# Altium PCB PCI Express_16765X6890_64PIN_Low profile_Clear.PCBDOC (part 2 of 9)
Units mm, origin at the board's own origin, x right, y up, seen from the top; angles counter-clockwise.
Board outline 80.71 x 137.84 mm, 6 copper layers (Top Layer, Layer 2 (GND), Layer 3, Layer 4, Layer 5 (AGND), Bottom Layer), stack 1.571 mm thick; 507 components, 297 nets, 1544 pads, 616 vias.
Unrouted connection lines stored in the file: 101.
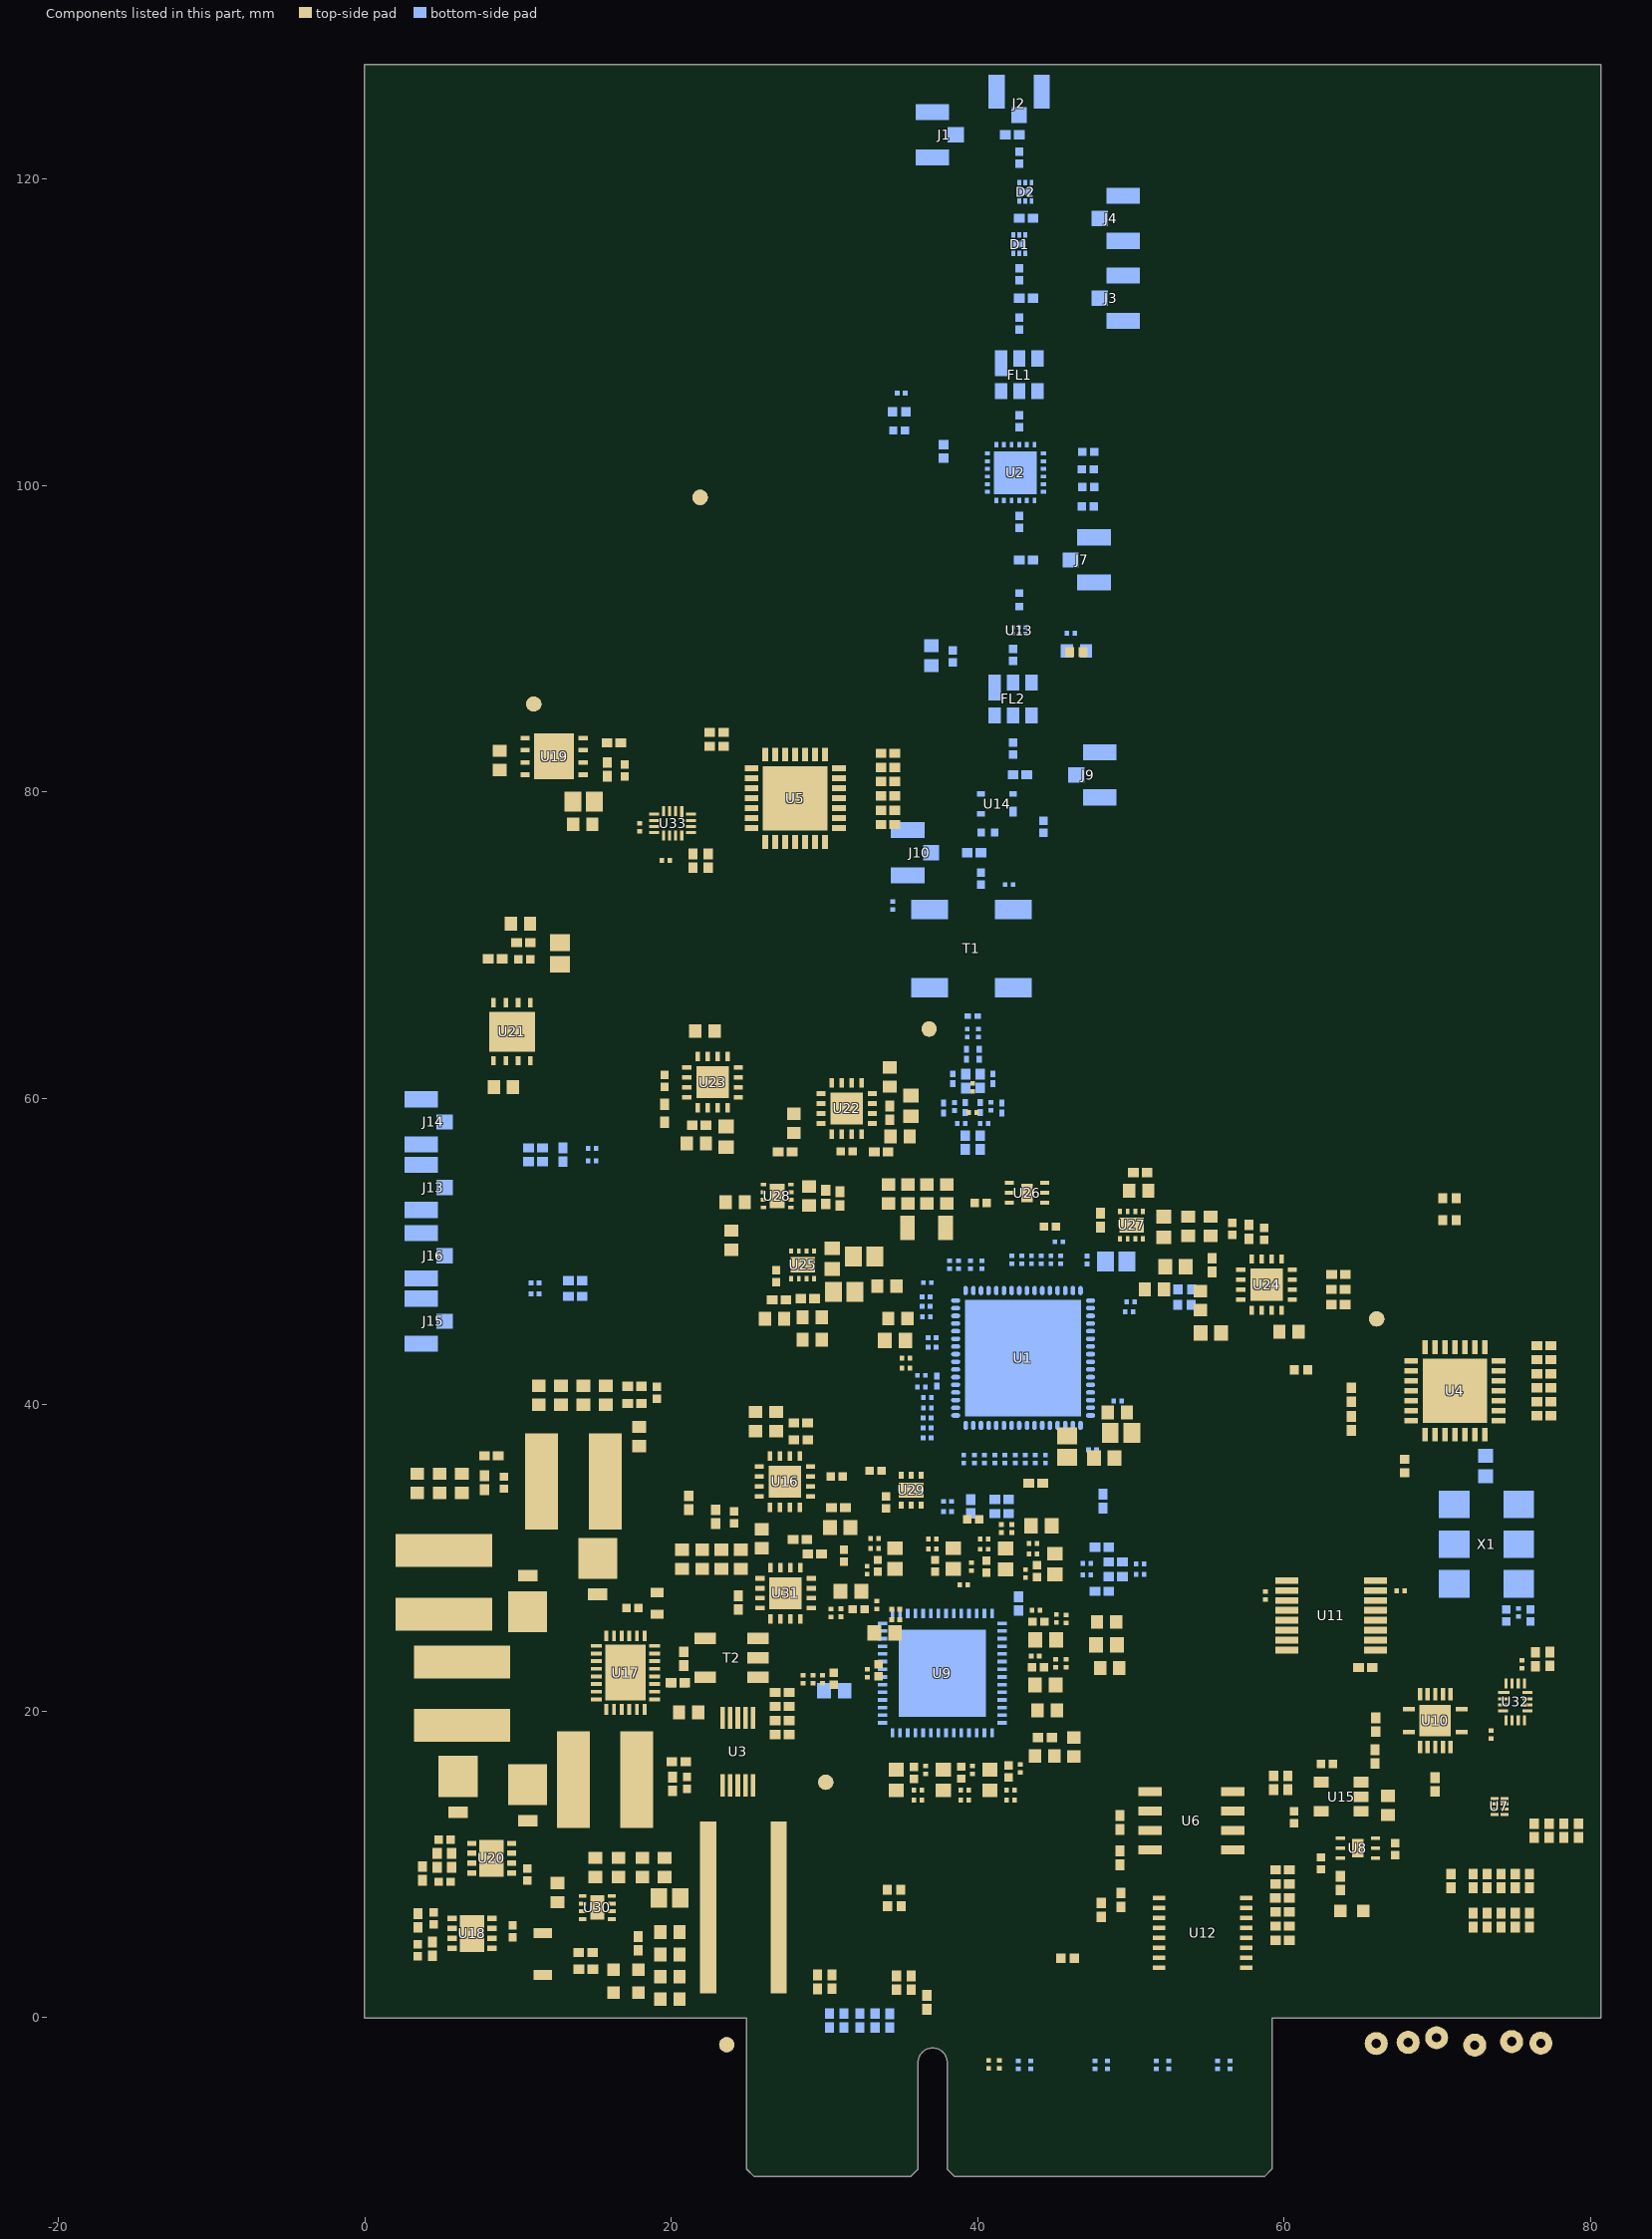
[diagram p4: the components of this part, seen from the top]

## Footprints (in the part's own frame and the unit in brackets; to place one, negate y for a bottom-side part, rotate by r counter-clockwise, add the part's x,y. Pads: shape width x height; smd on the part's side, far side on the other; paste and mask are expansions set on the pad) (continued)
MCP23017/MCP23S17 [mm] "QFN, 28-Leads, Body 6,00x6,00mm, Pitch 0,65mm, Thermal Pad 4,25x4,25mm, IPC High Density"
  rect 0.9x0.37 smd: 1(-2.85,1.95) 2(-2.85,1.3) 3(-2.85,0.65) 4(-2.85,0) 5(-2.85,-0.65) 6(-2.85,-1.3) 7(-2.85,-1.95) 15(2.85,-1.95) 16(2.85,-1.3) 17(2.85,-0.65) 18(2.85,0) 19(2.85,0.65) 20(2.85,1.3) 21(2.85,1.95)
  rect 0.37x0.9 smd: 8(-1.95,-2.85) 9(-1.3,-2.85) 10(-0.65,-2.85) 11(0,-2.85) 12(0.65,-2.85) 13(1.3,-2.85) 14(1.95,-2.85) 22(1.95,2.85) 23(1.3,2.85) 24(0.65,2.85) 25(0,2.85) 26(-0.65,2.85) 27(-1.3,2.85) 28(-1.95,2.85)
  rect 4.2x4.2 smd paste-2.125: 29(0,0)
  silkscreen extent -3.92,-3.15 3.15,3.15, body extent -3,-3 3,3, height 1
PCA9306 [mm] "8-XFDFN, Body 1,40x1,00mm, Pitch 0,35mm, IPC High Density"
  rect 0.53x0.2 smd: 1(-0.335,0.525) 2(-0.335,0.175) 3(-0.335,-0.175) 4(-0.335,-0.525) 5(0.335,-0.525) 6(0.335,-0.175) 7(0.335,0.175) 8(0.335,0.525)
  silkscreen extent -0.86,0.79 -0.76,0.89, body extent -0.53,-0.72 0.53,0.72, height 0.4
RC1206 [mm] "Chip Resistor, 2-Leads, Body 3,10x1,60mm, IPC High Density"
  rect 0.95x1.6 smd: 1(-1.25,0) 2(1.25,0)
  silkscreen extent -0.5,-0.7 0.5,0.7, body extent -1.6,-0.85 1.6,0.85, height 0.65
"RES 0201/0603" [mm] "Chip Resistor, 2-Leads, Body 0.60x0.30mm, IPC Medium Density"
  rect 0.44x0.35 smd: 1(-0.325,0) 2(0.325,0)
  silkscreen extent -0.7,-0.33 0.7,0.33, body extent -0.3,-0.15 0.3,0.15, height 0.21
"RES 0402/1005" [mm] "Chip Resistor, 2-Leads, Body 1.0x0.5mm, IPC Medium Density"
  rect 0.75x0.6 smd: 1(-0.575,0) 2(0.575,0)
  silkscreen extent -1.14,-0.51 1.14,0.51, body extent -0.5,-0.25 0.5,0.25, height 0.35
"RES 0402/1005 RF" [mm] "Chip Resistor, 2-Leads, Body 1.0x0.5mm, IPC High Density"
  rect 0.7x0.6 smd: 1(-0.45,0) 2(0.45,0)
  silkscreen extent -1.02,-0.51 1.02,0.51, body extent -0.5,-0.25 0.5,0.25, height 0.35
"RES 0603/1608" [mm] "Chip Resistor, 2-Leads, Body 1.60x0.80mm, IPC Medium Density"
  rect 0.85x0.95 smd: 1(-0.65,0) 2(0.65,0)
  silkscreen extent -1.27,-0.7 1.27,0.7, body extent -0.8,-0.4 0.8,0.4, height 0.45
SC18IS602B [mm] "TSSOP16: plastic thin shrink small outline package; 16 leads; body width 4.4 mm"
  rect 0.8x0.3 smd: 1(-2.85,2.275) 2(-2.85,1.625) 3(-2.85,0.975) 4(-2.85,0.325) 5(-2.85,-0.325) 6(-2.85,-0.975) 7(-2.85,-1.625) 8(-2.85,-2.275) 9(2.85,-2.275) 10(2.85,-1.625) 11(2.85,-0.975) 12(2.85,-0.325) 13(2.85,0.325) 14(2.85,0.975) 15(2.85,1.625) 16(2.85,2.275)
  silkscreen extent -2.97,-2.55 1.85,3.12, body extent -3.2,-2.55 3.2,2.55, height 1.1
SN74AXC4T774PWR [mm] "TSOP,PW0016A, 16-Leads, Body 5,00x4,40mm, Pitch 0,65mm, IPC High Density"
  rect 1.5x0.45 smd: 1(-2.9,2.275) 2(-2.9,1.625) 3(-2.9,0.975) 4(-2.9,0.325) 5(-2.9,-0.325) 6(-2.9,-0.975) 7(-2.9,-1.625) 8(-2.9,-2.275) 9(2.9,-2.275) 10(2.9,-1.625) 11(2.9,-0.975) 12(2.9,-0.325) 13(2.9,0.325) 14(2.9,0.975) 15(2.9,1.625) 16(2.9,2.275)
  silkscreen extent -3.02,-2.55 1.85,3.17, body extent -3.2,-2.55 3.2,2.55, height 1.2
SN74LV4T125RGYR [mm] "14-VFQFN Exposed Pad"
  rect 0.8x0.28 smd: 1(-1.733,-0.75) 7(1.717,-0.75) 8(1.717,0.75) 14(-1.733,0.75)
  rect 0.28x0.8 smd: 2(-1.008,-1.725) 3(-0.508,-1.725) 4(-0.008,-1.725) 5(0.492,-1.725) 6(0.992,-1.725) 9(0.992,1.725) 10(0.492,1.725) 11(-0.008,1.725) 12(-0.508,1.725) 13(-1.008,1.725)
  rect 2.05x2.05 smd paste-3: 15(-0.008,0)
  silkscreen extent -1.81,-1.8 1.79,1.8, body extent -1.81,-1.8 1.79,1.8, height 1
TAI-SAW_3X3P6 [mm] "TA1251B, 6-Pins, Body 3,00x3,00mmx1,40mm, Pitch 1,20mm, IPC Medium Density"
  rect 1.7x0.81 smd: 1(-0.75,1.2)
  rect 1.05x0.81 smd: 2(-1.07,0) 3(-1.07,-1.2) 4(1.07,-1.2) 5(1.07,0) 6(1.07,1.2)
  silkscreen extent -2.27,-2 1.6,2, body extent -1.5,-1.5 1.5,1.5, height 1.4
TECO-1909763-1_V [mm] "SMD, 3-Leads, Body 2.6x2.6mm, Height 1.25mm"
  rect 1.05x2.2 smd: 1(-1.475,0) 3(1.475,0)
  rect 1x1.05 smd: 2(0,-1.525)
  silkscreen extent -1.9,-1.78 0.55,1.3, body extent -1.5,-1.55 1.5,1.55, height 1.23
"Test Point" [mm]
  round 1.5 hole 0.6: 1(0,0)
TPS7A3501 [mm] "6-WDFN Exposed Pad"
  rect 0.45x0.3 smd: 1(-0.975,0.65) 2(-0.975,0) 3(-0.975,-0.65) 4(0.975,-0.65) 5(0.975,0) 6(0.975,0.65)
  rect 1x1.6 smd: 7(0,0)
  silkscreen extent -1.5,-1.2 1.05,1.25, body extent -1.13,-1.05 1.13,1.05, height 0.8
TPS62163 [mm] "DSG0008A WSON - 0.8 mm max height"
  rect 0.5x0.25 smd: 1(-0.95,0.75) 2(-0.95,0.25) 3(-0.95,-0.25) 4(-0.95,-0.75) 5(0.95,-0.75) 6(0.95,-0.25) 7(0.95,0.25) 8(0.95,0.75)
  rect 0.9x1.6 smd: 9(0,0)
  silkscreen extent -1.5,-1.2 1.05,1.25, body extent -1.1,-1.05 1.1,1.05, height 0.8
TSNP-6-10-FP [mm] "TSNP-6-10-FP, SOTFL, 6-Leads, Body 1,10x0,80mm, Pitch 0,40mm, IPC Medium Density"
  rect 0.25x0.25 smd: 1(-0.2,0.4) 2(-0.2,0) 3(-0.2,-0.4) 4(0.2,-0.4) 5(0.2,0) 6(0.2,0.4)
  silkscreen extent -0.39,0.8 -0.29,0.9, body extent -0.4,-0.55 0.4,0.55, height 0.37
TXB0304 [mm] "RSV0016A UQFN - 0.55 mm max height"
  rect 0.75x0.2 smd: 1(-0.75,0.6)
  rect 0.65x0.2 smd: 2(-0.8,0.2) 3(-0.8,-0.2) 4(-0.8,-0.6) 9(0.8,-0.6) 10(0.8,-0.2) 11(0.8,0.2) 12(0.8,0.6)
  rect 0.2x0.65 smd: 5(-0.6,-1.2) 6(-0.2,-1.2) 7(0.2,-1.2) 8(0.6,-1.2) 13(0.6,1.2) 14(0.2,1.2) 15(-0.2,1.2) 16(-0.6,1.2)
  silkscreen extent -1.27,1.58 -1.18,1.67, body extent -0.92,-1.33 0.92,1.33, height 0.55
VG-4513CA [mm] "SON, 6-Leads, Body 7,00x5,00mm, Pitch 2,60mm, IPC High Density"
  rect 2x1.8 smd: 1(-2.1,2.6) 2(-2.1,0) 3(-2.1,-2.6) 4(2.1,-2.6) 5(2.1,0) 6(2.1,2.6)
  silkscreen extent -3.36,3.66 -3.26,3.76, body extent -2.6,-3.6 2.6,3.6, height 1.8
VLF3012ST-2R2M1R4 [mm] "Precision Wire Wound Inductor, 2-Leads, Body 3.00x2.80mm, IPC High Density"
  rect 0.65x1.2 smd: 1(-1.375,0) 2(1.375,0)
  silkscreen extent -1.5,-1.4 1.5,1.4, body extent -1.6,-1.4 1.6,1.4, height 1.3

## Part data
C1 C7: library part Capacitor, Case/Package=0201, Case Code (Metric)=0603, Dielectric=C0G, Manufacturer 1=Murata, Manufacturer Part Number 1=GJM0335C1E4R0CB01D, Max Operating Temperature=125°C, Min Operating Temperature=-55°C, Package Quantity=1, Supplier Part Number 1=490-3068-1-ND, Voltage Rating=25V, Capacitance=4pF, Case Code (Imperial)=0201, ComponentLink1Description=https://datasheet.ciiva.com/133/product-133426.pdf?src-supplier=Digi-Key, ComponentLink1URL=https://datasheet.ciiva.com/133/product-133426.pdf?src-supplier=Digi-Key, ComponentLink2Description=https://datasheet.ciiva.com/133/partnumbering-e-01-133427.pdf?src-supplier=Digi-Key, ComponentLink2URL=https://datasheet.ciiva.com/133/partnumbering-e-01-133427.pdf?src-supplier=Digi-Key, ComponentLink3Description=https://datasheet.ciiva.com/133/partnumbering-e-01-133428.pdf?src-supplier=Digi-Key, ComponentLink3URL=https://datasheet.ciiva.com/133/partnumbering-e-01-133428.pdf?src-supplier=Digi-Key, ComponentLink4Description=https://datasheet.ciiva.com/16467/l0005e-16467449.pdf?src-supplier=Future+Electronics, ComponentLink4URL=https://datasheet.ciiva.com/16467/l0005e-16467449.pdf?src-supplier=Future+Electronics, ComponentLink5Description=https://datasheet.ciiva.com/11613/product-11613563.pdf?src-supplier=Avnet, ComponentLink5URL=https://datasheet.ciiva.com/11613/product-11613563.pdf?src-supplier=Avnet, Depth=0.3mm, Height=0.3mm, Lead Free="Lead Free", Length=0.6mm, Mount="Surface Mount", Packaging="Tape and Reel", Pricing 1="1=0.10000, 10=0.07300, 100=0.03240, 500=0.02318, 1000=0.01821, 2500=0.01655, 5000=0.01523 (USD)", Radiation Hardening=No, RoHS=Yes, Stock 1=33697, Supplier 1=Digi-Key, Termination=SMD/SMT, Thickness=0.013inch, Voltage Rating (DC)=25V, Width=0.012inch
C2 C5 C8: library part Capacitor, Case/Package=0201, Case Code (Metric)=0603, Dielectric=C0G, Manufacturer 1=Murata, Manufacturer Part Number 1=GRM0335C1E1R0CA01D, Max Operating Temperature=125°C, Min Operating Temperature=-55°C, Package Quantity=15000, Supplier Part Number 1=490-7749-1-ND, Voltage Rating=25V, Capacitance=1pF, Case Code (Imperial)=0201, ComponentLink1Description=https://datasheet.ciiva.com/29540/partnumbering-e-01-29540585.pdf?src-supplier=Digi-Key, ComponentLink1URL=https://datasheet.ciiva.com/29540/partnumbering-e-01-29540585.pdf?src-supplier=Digi-Key, ComponentLink2Description=https://datasheet.ciiva.com/29540/partnumbering-e-01-29540586.pdf?src-supplier=Digi-Key, ComponentLink2URL=https://datasheet.ciiva.com/29540/partnumbering-e-01-29540586.pdf?src-supplier=Digi-Key, ComponentLink3Description=https://datasheet.ciiva.com/29540/partnumbering-e-01-29540587.pdf?src-supplier=Digi-Key, ComponentLink3URL=https://datasheet.ciiva.com/29540/partnumbering-e-01-29540587.pdf?src-supplier=Digi-Key, Depth=0.3mm, Height=0.3mm, Lead Free="Lead Free", Length=0.6mm, Mount="Surface Mount", Packaging="Tape and Reel", Pricing 1="1=0.10000, 10=0.01500, 100=0.00680, 500=0.00484, 1000=0.00380, 2500=0.00345, 5000=0.00317 (USD)", REACH SVHC="No SVHC", RoHS=Yes, Stock 1=33122, Supplier 1=Digi-Key, Termination=SMD/SMT, Thickness=0.013inch, Voltage Rating (DC)=25V, Width=0.012inch
C3 C4 C6 C175 C176 C178 C179 C183 C185 C186 C187 C188 C189 C223 C224 C225 C226 C227 C228: library part Capacitor, Case/Package=0201, Case Code (Metric)=0603, Dielectric=X5R, Manufacturer 1=Yageo, Manufacturer Part Number 1=CC0201KRX5R6BB104, Max Operating Temperature=85°C, Min Operating Temperature=-55°C, Supplier Part Number 1=311-1593-1-ND, Tolerance=10%, Voltage Rating=10V, Capacitance=100nF, Case Code (Imperial)=0201, ComponentLink1Description=https://datasheet.ciiva.com/17437/upy-gphc-x5r-4v-to-50v-12-17437495.pdf?src-supplier=Avnet+Europe, ComponentLink1URL=https://datasheet.ciiva.com/17437/upy-gphc-x5r-4v-to-50v-12-17437495.pdf?src-supplier=Avnet+Europe, ComponentLink2Description=https://datasheet.ciiva.com/11587/upy-gphc-x5r-4v-to-50v-12-11587190.pdf?src-supplier=Avnet, ComponentLink2URL=https://datasheet.ciiva.com/11587/upy-gphc-x5r-4v-to-50v-12-11587190.pdf?src-supplier=Avnet, Composition=Ceramic, Depth=0.3mm, Halogen Free="Halogen Free", Height=0.3mm, Lead Free="Lead Free", Length=0.6mm, Mount="Surface Mount", Packaging="Tape and Reel", Pricing 1="1=0.10000, 10=0.03800, 100=0.01690, 500=0.01208, 1000=0.00949, 2500=0.00862, 5000=0.00794 (USD)", Radiation Hardening=No, RoHS=Yes, Stock 1=1229391, Supplier 1=Digi-Key, Termination=SMD/SMT, Thickness=0.013inch, Voltage Rating (DC)=10V, Weight=6E-06oz, Width=0.012inch
C9 C15 C16 C17 C18 C27 C88 C89 C99 C100 C101 C102 C103 C104 C105 C106 C107 C108 C109 C110 C111 C113 C114 C115 C116 C117 C118 C119 C120 C121 C122 C123 C124 C125 C132 C133 C134 C136 C137 C138 C139 C150 C151 C152 C154 C155 C156 C158 C159 C160 C162 C163 C164 C166 C167 C174 C181 C182 C184 C191 C192 C193 C195 C196 C197 C199 C200 C201 C203 C204 C205 C207 C208 C209 C211 C212 C213 C215 C216 C217 C229 C233 C234 C235 C236: library part Capacitor, Case/Package=0201, Case Code (Metric)=0603, Dielectric=X5R, Manufacturer 1=Murata, Manufacturer Part Number 1=GRM033R61C104ME84D, Max Operating Temperature=85°C, Min Operating Temperature=-55°C, Package Quantity=15000, Supplier Part Number 1=490-9986-1-ND, Tolerance=20%, Voltage Rating=16V, Capacitance=100nF, Case Code (Imperial)=0201, Height=0.3mm, Length=0.024inch, Mount="Surface Mount", Packaging="Tape and Reel", Pricing 1="1=0.10000, 10=0.05400, 100=0.02430, 500=0.01732, 1000=0.01361, 2500=0.01238, 5000=0.01139 (USD)", RoHS=Yes, Supplier 1=Digi-Key, Termination=SMD/SMT, Thickness=0.013inch, Voltage Rating (DC)=16V, Weight=1.2E-05oz, Width=0.3mm
  C9 C27 C132 C133 C134 C136 C137 C138 C139 C229: ComponentLink1Description=http://www.mouser.com/ds/2/281/c02e-2905.pdf?src-supplier=Mouser, ComponentLink1URL=http://www.mouser.com/ds/2/281/c02e-2905.pdf?src-supplier=Mouser, ComponentLink2Description=http://search.murata.co.jp/Ceramy/image/img/A01X/G101/ENG/GRM033R61C104ME84-01.pdf?src-supplier=Digi-Key, ComponentLink2URL=http://search.murata.co.jp/Ceramy/image/img/A01X/G101/ENG/GRM033R61C104ME84-01.pdf?src-supplier=Digi-Key, Stock 1=550070
  C15 C16 C17 C18 C233 C234 C235 C236: ComponentLink1Description=http://www.mouser.com/ds/2/281/c02e-2905.pdf?src-supplier=Mouser, ComponentLink1URL=http://www.mouser.com/ds/2/281/c02e-2905.pdf?src-supplier=Mouser, ComponentLink2Description=http://search.murata.co.jp/Ceramy/image/img/A01X/G101/ENG/GRM033R61C104ME84-01.pdf?src-supplier=Digi-Key, ComponentLink2URL=http://search.murata.co.jp/Ceramy/image/img/A01X/G101/ENG/GRM033R61C104ME84-01.pdf?src-supplier=Digi-Key, Stock 1=502660
  C88 C89 C99 C100 C101 C102 C103 C104 C105 C106 C107 C108 C109 C110 C111 C113 C114 C115 C116 C117 C118 C119 C120 C121 C122 C123 C124 C125: ComponentLink1Description=http://search.murata.co.jp/Ceramy/image/img/A01X/G101/ENG/GRM033R61C104KE84-01.pdf?src-supplier=Digi-Key, ComponentLink1URL=http://search.murata.co.jp/Ceramy/image/img/A01X/G101/ENG/GRM033R61C104KE84-01.pdf?src-supplier=Digi-Key, ComponentLink2Description=https://search.murata.co.jp/Ceramy/image/img/A01X/G101/ENG/GRM033R61C104KE84-01.pdf?src-supplier=Digi-Key, ComponentLink2URL=https://search.murata.co.jp/Ceramy/image/img/A01X/G101/ENG/GRM033R61C104KE84-01.pdf?src-supplier=Digi-Key, ComponentLink3Description=http://www.mouser.com/ds/2/281/c02e-2905.pdf?src-supplier=Mouser, ComponentLink3URL=http://www.mouser.com/ds/2/281/c02e-2905.pdf?src-supplier=Mouser, ComponentLink4Description=http://search.murata.co.jp/Ceramy/image/img/A01X/G101/ENG/GRM033R61C104ME84-01.pdf?src-supplier=Digi-Key, ComponentLink4URL=http://search.murata.co.jp/Ceramy/image/img/A01X/G101/ENG/GRM033R61C104ME84-01.pdf?src-supplier=Digi-Key, Stock 1=550070
  C150 C151 C152 C154 C155 C156 C158 C159 C160 C162 C163 C164 C166 C167 C174 C181 C182 C184 C191 C192 C193 C195 C196 C197 C199 C200 C201 C203 C204 C205 C207 C208 C209 C211 C212 C213 C215 C216 C217: ComponentLink1Description=http://www.mouser.com/ds/2/281/c02e-2905.pdf?src-supplier=Mouser, ComponentLink1URL=http://www.mouser.com/ds/2/281/c02e-2905.pdf?src-supplier=Mouser, ComponentLink2Description=http://search.murata.co.jp/Ceramy/image/img/A01X/G101/ENG/GRM033R61C104ME84-01.pdf?src-supplier=Digi-Key, ComponentLink2URL=http://search.murata.co.jp/Ceramy/image/img/A01X/G101/ENG/GRM033R61C104ME84-01.pdf?src-supplier=Digi-Key, Stock 1=503570
C10 C153 C157 C161 C165 C180 C190 C194 C198 C202 C206 C210 C214 C218: library part Capacitor, Case/Package=0402, Case Code (Metric)=1005, Dielectric=X5R, Manufacturer 1="Taiyo Yuden", Manufacturer Part Number 1=AMK105CBJ106MV-F, Max Operating Temperature=85°C, Min Operating Temperature=-55°C, Package Quantity=1, Supplier Part Number 1=587-3237-1-ND, Tolerance=20%, Voltage Rating=4V, Capacitance=10uF, Case Code (Imperial)=0402, ComponentLink1Description=https://datasheet.ciiva.com/6255/amk105cbj106mv-f-ss-6255363.pdf?src-supplier=Digi-Key, ComponentLink1URL=https://datasheet.ciiva.com/6255/amk105cbj106mv-f-ss-6255363.pdf?src-supplier=Digi-Key, ComponentLink2Description=https://datasheet.ciiva.com/30133/411amk105cbj106mv-f-30133635.pdf?src-supplier=Onlinecomponents.com, ComponentLink2URL=https://datasheet.ciiva.com/30133/411amk105cbj106mv-f-30133635.pdf?src-supplier=Onlinecomponents.com, ComponentLink3Description=https://datasheet.ciiva.com/15916/2amk105cbj106mv-f-15916827.pdf?src-supplier=Onlinecomponents.com, ComponentLink3URL=https://datasheet.ciiva.com/15916/2amk105cbj106mv-f-15916827.pdf?src-supplier=Onlinecomponents.com, Halogen Free="Halogen Free", Height=0.5mm, Length=0.039inch, Mount="Surface Mount", Packaging="Tape and Reel", Pricing 1="1=0.24000, 10=0.16500, 100=0.08340, 500=0.05708, 1000=0.05050, 2500=0.04830, 5000=0.04391 (USD)", REACH SVHC=Unknown, RoHS=Yes, Supplier 1=Digi-Key, Termination=SMD/SMT, Thickness=0.028inch, Voltage Rating (DC)=4V, Width=0.02inch
  C10: Stock 1=547645
  C153 C157 C161 C165 C180 C190 C194 C198 C202 C206 C210 C214 C218: Stock 1=313152
C11 C12 C13 C14: library part Capacitor, Case/Package=0402, Dielectric=C0G, Manufacturer 1="Walsin Technologies", Manufacturer Part Number 1=0402N331F500CT, Max Operating Temperature=125°C, Min Operating Temperature=-55°C, Supplier Part Number 1=1292-1307-1-ND, Tolerance=1%, Capacitance=330pF, ComponentLink1Description=http://components.arrow.com/part/dataview/0323_06535843?src-supplier=Arrow+Europe, ComponentLink1URL=http://components.arrow.com/part/dataview/0323_06535843?src-supplier=Arrow+Europe, ComponentLink2Description=http://www.passivecomponent.com/indexsea/0402N331F500CT-IN.pdf?src-supplier=Digi-Key, ComponentLink2URL=http://www.passivecomponent.com/indexsea/0402N331F500CT-IN.pdf?src-supplier=Digi-Key, Depth=0.5mm, Length=1mm, Packaging="Tape and Reel", Pricing 1="1=0.12000, 10=0.09000, 100=0.04030, 500=0.02876, 1000=0.02260, 2500=0.02054, 5000=0.01890 (USD)", RoHS=Yes, Stock 1=23341, Supplier 1=Digi-Key
C19 C20 C239 C240 C241 C242 C243 C244: library part Capacitor, Case/Package=0201, Dielectric=X5R, Manufacturer 1=Murata, Manufacturer Part Number 1=GRM033R61C104KE84J, Max Operating Temperature=85°C, Min Operating Temperature=-55°C, Supplier Part Number 1=490-16742-1-ND, Tolerance=10%, Voltage Rating=16V, Capacitance=100nF, ComponentLink1Description=http://search.murata.co.jp/Ceramy/image/img/A01X/G101/ENG/GRM033R61C104KE84-01.pdf?src-supplier=Digi-Key, ComponentLink1URL=http://search.murata.co.jp/Ceramy/image/img/A01X/G101/ENG/GRM033R61C104KE84-01.pdf?src-supplier=Digi-Key, ComponentLink2Description=https://search.murata.co.jp/Ceramy/image/img/A01X/G101/ENG/GRM033R61C104KE84-01.pdf?src-supplier=Digi-Key, ComponentLink2URL=https://search.murata.co.jp/Ceramy/image/img/A01X/G101/ENG/GRM033R61C104KE84-01.pdf?src-supplier=Digi-Key, Length=0.024inch, Mount="Surface Mount", Packaging="Tape and Reel", Pricing 1="1=0.10000, 10=0.06800, 100=0.03040, 500=0.02174, 1000=0.01708, 2500=0.01552, 5000=0.01428 (USD)", RoHS=Yes, Stock 1=54410, Supplier 1=Digi-Key, Thickness=0.013inch, Voltage Rating (DC)=16V, Width=0.012inch
C21 C22: library part Capacitor, Case/Package=0402, Case Code (Metric)=1005, Dielectric=C0G, Manufacturer 1="Kyocera AVX", Manufacturer Part Number 1=04025A220JAT2A, Max Operating Temperature=125°C, Min Operating Temperature=-55°C, Package Quantity=1, Supplier Part Number 1=478-1074-1-ND, Temperature Coefficient=30ppm/°C, Tolerance=5%, Voltage=50V, Capacitance=22pF, Case Code (Imperial)=0402, ComponentLink1Description=https://datasheet.ciiva.com/11787/0900766b80def0e2-11787300.pdf?src-supplier=RSComponents, ComponentLink1URL=https://datasheet.ciiva.com/11787/0900766b80def0e2-11787300.pdf?src-supplier=RSComponents, ComponentLink2Description=https://datasheet.ciiva.com/39121/2009578-39121644.pdf?src-supplier=Jameco, ComponentLink2URL=https://datasheet.ciiva.com/39121/2009578-39121644.pdf?src-supplier=Jameco, ComponentLink3Description=https://datasheet.ciiva.com/1123/ccog-1123585.pdf?src-supplier=Element14, ComponentLink3URL=https://datasheet.ciiva.com/1123/ccog-1123585.pdf?src-supplier=Element14, ComponentLink4Description=https://datasheet.ciiva.com/1123/ccog-1123586.pdf?src-supplier=Element14, ComponentLink4URL=https://datasheet.ciiva.com/1123/ccog-1123586.pdf?src-supplier=Element14, ComponentLink5Description=https://datasheet.ciiva.com/150/ccog-150515.pdf?src-supplier=Digi-Key, ComponentLink5URL=https://datasheet.ciiva.com/150/ccog-150515.pdf?src-supplier=Digi-Key, ComponentLink6Description=https://datasheet.ciiva.com/150/ccog-150516.pdf?src-supplier=Digi-Key, ComponentLink6URL=https://datasheet.ciiva.com/150/ccog-150516.pdf?src-supplier=Digi-Key, ComponentLink7Description=https://datasheet.ciiva.com/150/ccog-150517.pdf?src-supplier=Digi-Key, ComponentLink7URL=https://datasheet.ciiva.com/150/ccog-150517.pdf?src-supplier=Digi-Key, ComponentLink8Description=https://datasheet.ciiva.com/2987/ccog-2987653.pdf?src-supplier=Avnet, ComponentLink8URL=https://datasheet.ciiva.com/2987/ccog-2987653.pdf?src-supplier=Avnet, ComponentLink9Description=https://datasheet.ciiva.com/2987/ccog-2987654.pdf?src-supplier=Avnet, ComponentLink9URL=https://datasheet.ciiva.com/2987/ccog-2987654.pdf?src-supplier=Avnet, ComponentLink10Description=https://datasheet.ciiva.com/5423/ccog-243403-5423927.pdf?src-supplier=Mouser, ComponentLink10URL=https://datasheet.ciiva.com/5423/ccog-243403-5423927.pdf?src-supplier=Mouser, ComponentLink11Description=https://datasheet.ciiva.com/16218/ccog-16218185.pdf?src-supplier=Future+Electronics, ComponentLink11URL=https://datasheet.ciiva.com/16218/ccog-16218185.pdf?src-supplier=Future+Electronics, ComponentLink12Description=https://datasheet.ciiva.com/28592/759117-28592746.pdf?src-supplier=Element14, ComponentLink12URL=https://datasheet.ciiva.com/28592/759117-28592746.pdf?src-supplier=Element14, ComponentLink13Description=https://datasheet.ciiva.com/15165/getdatasheetpartid-38041-15165131.pdf?src-supplier=Verical, ComponentLink13URL=https://datasheet.ciiva.com/15165/getdatasheetpartid-38041-15165131.pdf?src-supplier=Verical, Contact Plating=Tin,Matte, Depth=0.5mm, Height=0.5mm, Lead Free="Lead Free", Length=1mm, Mount="Surface Mount", Number of Pins=2, Packaging="Tape and Reel", Pricing 1="1=0.10000, 10=0.03500, 100=0.01550, 500=0.01108, 1000=0.00871, 2500=0.00792, 5000=0.00729 (USD)", Radiation Hardening=No, REACH SVHC="No SVHC", RoHS=Yes, Stock 1=672328, Supplier 1=Digi-Key, Termination=SMD/SMT, Thickness=0.022inch, Voltage Rating=50V, Voltage Rating (DC)=50V, Width=0.02inch
C23 C24 C25 C28 C29 C30 C31 C32: library part Capacitor, Case/Package=0402, Dielectric=C0G, Dielectric Material=Ceramic, Manufacturer 1=KEMET, Manufacturer Part Number 1=C0402C330J5GACTU, Max Operating Temperature=125°C, Min Operating Temperature=-55°C, Supplier Part Number 1=399-1017-1-ND, Temperature Coefficient=30ppm/°C, Tolerance=5%, Voltage=50V, Capacitance=33pF, ComponentLink1Description=https://datasheet.ciiva.com/45846/kem-c1003-c0g-smd-45846921.pdf?src-supplier=Onlinecomponents.com, ComponentLink1URL=https://datasheet.ciiva.com/45846/kem-c1003-c0g-smd-45846921.pdf?src-supplier=Onlinecomponents.com, Depth=0.5mm, Height=0.5mm, Lead Free="Lead Free", Length=1mm, Mount="Surface Mount", Packaging="Tape and Reel", Pricing 1="1=0.10000, 10=0.03900, 100=0.01740, 500=0.01240, 1000=0.00974, 2500=0.00886, 5000=0.00815 (USD)", Radiation Hardening=No, RoHS=Yes, Stock 1=690392, Supplier 1=Digi-Key, Termination=SMD/SMT, Voltage Rating (DC)=50V
C26: library part Capacitor, Case/Package=0603, Case Code (Metric)=1608, Dielectric=X5R, Manufacturer 1="Kyocera AVX", Manufacturer Part Number 1=0603ZD225MAT2A, Max Operating Temperature=85°C, Min Operating Temperature=-55°C, Package Quantity=1, Supplier Part Number 1=478-7941-1-ND, Tolerance=20%, Voltage Rating=10V, Capacitance=2.2uF, Case Code (Imperial)=0603, ComponentLink1Description=https://datasheet.ciiva.com/13189/cx5r-13189447.pdf?src-supplier=Mouser, ComponentLink1URL=https://datasheet.ciiva.com/13189/cx5r-13189447.pdf?src-supplier=Mouser, ComponentLink2Description=https://datasheet.ciiva.com/14905/cx5r-14905223.pdf?src-supplier=Digi-Key, ComponentLink2URL=https://datasheet.ciiva.com/14905/cx5r-14905223.pdf?src-supplier=Digi-Key, ComponentLink3Description=https://datasheet.ciiva.com/14905/cx5r-14905224.pdf?src-supplier=Digi-Key, ComponentLink3URL=https://datasheet.ciiva.com/14905/cx5r-14905224.pdf?src-supplier=Digi-Key, ComponentLink4Description=https://datasheet.ciiva.com/214/cx5r-214837.pdf?src-supplier=Digi-Key, ComponentLink4URL=https://datasheet.ciiva.com/214/cx5r-214837.pdf?src-supplier=Digi-Key, ComponentLink5Description=https://datasheet.ciiva.com/7614/cx5r-7614715.pdf?src-supplier=Digi-Key, ComponentLink5URL=https://datasheet.ciiva.com/7614/cx5r-7614715.pdf?src-supplier=Digi-Key, Depth=0.81mm, Lead Free="Lead Free", Length=1.6mm, Mount="Surface Mount", Number of Pins=2, Packaging="Tape and Reel", Pricing 1="1=0.22000, 10=0.15300, 100=0.07740, 500=0.05296, 1000=0.04686 (USD)", REACH SVHC=Unknown, RoHS=Yes, Stock 1=2703, Supplier 1=Digi-Key, Termination=SMD/SMT, Thickness=0.035inch, Voltage Rating (DC)=10V, Width=0.032inch
C33: library part Capacitor, Case/Package=0603, Case Code (Metric)=1608, Dielectric=X5R, Manufacturer 1=Samsung, Manufacturer Part Number 1=CL10A105KA8NNNC, Max Operating Temperature=85°C, Min Operating Temperature=-55°C, Package Quantity=1, Supplier Part Number 1=1276-1102-1-ND, Tolerance=10%, Voltage=25V, Capacitance=1uF, Case Code (Imperial)=0603, ComponentLink1Description=https://datasheet.ciiva.com/25801/cl10a105ka8nnnc-25801364.pdf?src-supplier=Digi-Key, ComponentLink1URL=https://datasheet.ciiva.com/25801/cl10a105ka8nnnc-25801364.pdf?src-supplier=Digi-Key, ComponentLink2Description=https://datasheet.ciiva.com/26838/getdatasheetpartid-357530-26838332.pdf?src-supplier=Verical, ComponentLink2URL=https://datasheet.ciiva.com/26838/getdatasheetpartid-357530-26838332.pdf?src-supplier=Verical, ComponentLink3Description=https://datasheet.ciiva.com/29198/458162-da-01-en-vs-kondensator-0603-29198475.pdf?src-supplier=Conrad, ComponentLink3URL=https://datasheet.ciiva.com/29198/458162-da-01-en-vs-kondensator-0603-29198475.pdf?src-supplier=Conrad, Contact Plating=Tin, Depth=0.8mm, Height=0.8mm, Lead Free="Lead Free", Length=1.6mm, Material=Ceramic, Mount="Surface Mount", Packaging="Tape and Reel", Pricing 1="1=0.10000, 10=0.04100, 100=0.01850, 500=0.01320, 1000=0.01037 (USD)", Radiation Hardening=No, RoHS=Yes, Stock 1=3421596, Supplier 1=Digi-Key, Thickness=0.035inch, Voltage Rating=25V, Voltage Rating (DC)=25V, Width=0.031inch
C34: library part Capacitor, Case/Package=0402, Case Code (Metric)=1005, Dielectric=X5R, Manufacturer 1=Murata, Manufacturer Part Number 1=GRM155R60J225ME95D, Max Operating Temperature=85°C, Min Operating Temperature=-55°C, Supplier Part Number 1=490-13407-1-ND, Tolerance=20%, Voltage=6.3V, Capacitance=2.2uF, Case Code (Imperial)=0402, ComponentLink1Description=https://datasheet.ciiva.com/46418/1754687-46418043.pdf?src-supplier=Element14, ComponentLink1URL=https://datasheet.ciiva.com/46418/1754687-46418043.pdf?src-supplier=Element14, Depth=0.5mm, Height=0.5mm, Lead Free="Lead Free", Length=1mm, Mount="Surface Mount", Packaging="Cut Tape", Pricing 1="1=0.12000, 10=0.08600, 100=0.04050, 500=0.02842, 1000=0.02353, 2500=0.02190, 5000=0.02004 (USD)", REACH SVHC="No SVHC", RoHS=Yes, Stock 1=221253, Supplier 1=Digi-Key, Thickness=0.022inch, Voltage Rating=6.3V, Voltage Rating (DC)=6.3V, Width=0.02inch
C35 C36 C38 C40 C41 C42 C43 C76 C77 C78 C80 C81 C82 C83 C85 C86 C93 C98 C127 C130 C219 C220: library part Capacitor, Case/Package=0603, Case Code (Metric)=1608, Dielectric=X5R, Manufacturer 1=Samsung, Manufacturer Part Number 1=CL10A475KO8NNNC, Max Operating Temperature=85°C, Min Operating Temperature=-55°C, Package Quantity=1, Supplier Part Number 1=1276-1784-1-ND, Tolerance=10%, Voltage=16V, Capacitance=4.7uF, Case Code (Imperial)=0603, ComponentLink1Description=https://datasheet.ciiva.com/25795/cl10a475ko8nnnc-25795890.pdf?src-supplier=Digi-Key, ComponentLink1URL=https://datasheet.ciiva.com/25795/cl10a475ko8nnnc-25795890.pdf?src-supplier=Digi-Key, ComponentLink2Description=https://datasheet.ciiva.com/26838/getdatasheetpartid-358619-26838383.pdf?src-supplier=Verical, ComponentLink2URL=https://datasheet.ciiva.com/26838/getdatasheetpartid-358619-26838383.pdf?src-supplier=Verical, ComponentLink3Description=https://datasheet.ciiva.com/29198/457663-da-01-en-vs-kondensator-0603-29198671.pdf?src-supplier=Conrad, ComponentLink3URL=https://datasheet.ciiva.com/29198/457663-da-01-en-vs-kondensator-0603-29198671.pdf?src-supplier=Conrad, Contact Plating=Tin, Depth=0.8mm, Height=0.8mm, Length=1.6mm, Material=Ceramic, Mount="Surface Mount", Packaging="Tape and Reel", Pricing 1="1=0.26000, 10=0.17800, 100=0.10100, 500=0.07128, 1000=0.06237 (USD)", Radiation Hardening=No, RoHS=Yes, Supplier 1=Digi-Key, Thickness=0.035inch, Voltage Rating=16V, Width=0.031inch
  C35 C36 C38 C40 C41 C42 C43: Stock 1=468811
  C76 C77 C78 C80 C81 C82 C83 C85 C86 C93 C98 C127 C130: Stock 1=472881
  C219 C220: Stock 1=457572
C37: library part Capacitor, Case/Package=0402, Case Code (Metric)=1005, Dielectric=X7R, Manufacturer 1="Kyocera AVX", Manufacturer Part Number 1=04025C101KAT2A, Max Operating Temperature=125°C, Min Operating Temperature=-55°C, Package Quantity=1, Supplier Part Number 1=478-1089-1-ND, Tolerance=10%, Voltage=50V, Capacitance=100pF, Case Code (Imperial)=0402, ComponentLink1Description=https://datasheet.ciiva.com/34303/1928935-34303276.pdf?src-supplier=Jameco, ComponentLink1URL=https://datasheet.ciiva.com/34303/1928935-34303276.pdf?src-supplier=Jameco, ComponentLink2Description=https://datasheet.ciiva.com/151/cx7r-151045.pdf?src-supplier=Digi-Key, ComponentLink2URL=https://datasheet.ciiva.com/151/cx7r-151045.pdf?src-supplier=Digi-Key, ComponentLink3Description=https://datasheet.ciiva.com/22619/1679506-22619749.pdf?src-supplier=Element14, ComponentLink3URL=https://datasheet.ciiva.com/22619/1679506-22619749.pdf?src-supplier=Element14, ComponentLink4Description=https://datasheet.ciiva.com/151/cx7r-151046.pdf?src-supplier=Digi-Key, ComponentLink4URL=https://datasheet.ciiva.com/151/cx7r-151046.pdf?src-supplier=Digi-Key, ComponentLink5Description=https://datasheet.ciiva.com/5415/cx7r-218113-5415051.pdf?src-supplier=Mouser, ComponentLink5URL=https://datasheet.ciiva.com/5415/cx7r-218113-5415051.pdf?src-supplier=Mouser, ComponentLink6Description=https://datasheet.ciiva.com/28586/1818074-28586573.pdf?src-supplier=Element14, ComponentLink6URL=https://datasheet.ciiva.com/28586/1818074-28586573.pdf?src-supplier=Element14, ComponentLink7Description=https://datasheet.ciiva.com/151/cx7r-151047.pdf?src-supplier=Digi-Key, ComponentLink7URL=https://datasheet.ciiva.com/151/cx7r-151047.pdf?src-supplier=Digi-Key, ComponentLink8Description=https://datasheet.ciiva.com/28453/1679506-28453959.pdf?src-supplier=Element14, ComponentLink8URL=https://datasheet.ciiva.com/28453/1679506-28453959.pdf?src-supplier=Element14, ComponentLink9Description=https://datasheet.ciiva.com/28586/1679506-28586589.pdf?src-supplier=Element14, ComponentLink9URL=https://datasheet.ciiva.com/28586/1679506-28586589.pdf?src-supplier=Element14, ComponentLink10Description=https://datasheet.ciiva.com/16287/cx7r-16287262.pdf?src-supplier=Future+Electronics, ComponentLink10URL=https://datasheet.ciiva.com/16287/cx7r-16287262.pdf?src-supplier=Future+Electronics, Depth=0.5mm, Lead Free="Lead Free", Length=1mm, Mount="Surface Mount", Number of Pins=2, Packaging="Tape and Reel", Pricing 1="1=0.10000, 10=0.06000, 100=0.02650, 500=0.01894, 1000=0.01488, 2500=0.01353, 5000=0.01245 (USD)", Radiation Hardening=No, REACH SVHC="No SVHC", RoHS=Yes, Stock 1=434421, Supplier 1=Digi-Key, Termination=SMD/SMT, Thickness=0.022inch, Voltage Rating=50V, Voltage Rating (DC)=50V, Width=0.02inch
C39 C79 C84 C87 C221 C232: library part Capacitor, Case/Package=0402, Case Code (Metric)=1005, Dielectric=C0G, Dielectric Material=Ceramic, Insulation Resistance=10GR, Manufacturer 1=Murata, Manufacturer Part Number 1=GRM1555C1H102JA01D, Max Operating Temperature=125°C, Min Operating Temperature=-55°C, Package Quantity=1, Supplier Part Number 1=490-3244-1-ND, Temperature Coefficient=30ppm/°C, Tolerance=5%, Voltage=50V, Capacitance=1nF, Case Code (Imperial)=0402, ComponentLink7Description=https://datasheet.ciiva.com/132/grm1555c1h102ja01-01-132801.pdf?src-supplier=Digi-Key, ComponentLink7URL=https://datasheet.ciiva.com/132/grm1555c1h102ja01-01-132801.pdf?src-supplier=Digi-Key, ComponentLink8Description=https://datasheet.ciiva.com/7828/4360-7828821.pdf?src-supplier=Element14, ComponentLink8URL=https://datasheet.ciiva.com/7828/4360-7828821.pdf?src-supplier=Element14, ComponentLink9Description=https://datasheet.ciiva.com/7828/1747436-7828822.pdf?src-supplier=Element14, ComponentLink9URL=https://datasheet.ciiva.com/7828/1747436-7828822.pdf?src-supplier=Element14, Depth=0.5mm, Height=0.5mm, Lead Free="Lead Free", Length=1mm, Material=Ceramic, Mount="Surface Mount", Number of Pins=2, Packaging="Tape and Reel", Pricing 1="1=0.11000, 10=0.07900, 100=0.03700, 500=0.02596, 1000=0.02149, 2500=0.02000, 5000=0.01830 (USD)", Radiation Hardening=No, REACH SVHC="No SVHC", RoHS=Yes, Supplier 1=Digi-Key, Termination=SMD/SMT, Thickness=0.022inch, Voltage Rating=50V, Voltage Rating (DC)=50V, Width=0.5mm
  C39 C79 C84 C87: ComponentLink1Description=https://datasheet.ciiva.com/132/grm1555c1h102ja01-01-132799.pdf?src-supplier=Digi-Key, ComponentLink1URL=https://datasheet.ciiva.com/132/grm1555c1h102ja01-01-132799.pdf?src-supplier=Digi-Key, ComponentLink2Description=https://datasheet.ciiva.com/132/product-132800.pdf?src-supplier=Digi-Key, ComponentLink2URL=https://datasheet.ciiva.com/132/product-132800.pdf?src-supplier=Digi-Key, ComponentLink3Description=https://datasheet.ciiva.com/34302/1855908-34302849.pdf?src-supplier=Jameco, ComponentLink3URL=https://datasheet.ciiva.com/34302/1855908-34302849.pdf?src-supplier=Jameco, ComponentLink4Description=https://datasheet.ciiva.com/18184/getdatasheetpartid-90260-18184180.pdf?src-supplier=Verical, ComponentLink4URL=https://datasheet.ciiva.com/18184/getdatasheetpartid-90260-18184180.pdf?src-supplier=Verical, ComponentLink5Description=https://datasheet.ciiva.com/29200/453569-da-01-en-vs-kondensator-0402-29200121.pdf?src-supplier=Conrad, ComponentLink5URL=https://datasheet.ciiva.com/29200/453569-da-01-en-vs-kondensator-0402-29200121.pdf?src-supplier=Conrad, ComponentLink6Description=https://datasheet.ciiva.com/14116/grmseries-tc-hitype-eng-14116858.pdf?src-supplier=Distrelec, ComponentLink6URL=https://datasheet.ciiva.com/14116/grmseries-tc-hitype-eng-14116858.pdf?src-supplier=Distrelec, Stock 1=5306035
  C221: ComponentLink1Description=https://datasheet.ciiva.com/132/grm1555c1h102ja01-01-132799.pdf?src-supplier=Digi-Key, ComponentLink1URL=https://datasheet.ciiva.com/132/grm1555c1h102ja01-01-132799.pdf?src-supplier=Digi-Key, ComponentLink2Description=https://datasheet.ciiva.com/132/product-132800.pdf?src-supplier=Digi-Key, ComponentLink2URL=https://datasheet.ciiva.com/132/product-132800.pdf?src-supplier=Digi-Key, ComponentLink3Description=https://datasheet.ciiva.com/34302/1855908-34302849.pdf?src-supplier=Jameco, ComponentLink3URL=https://datasheet.ciiva.com/34302/1855908-34302849.pdf?src-supplier=Jameco, ComponentLink4Description=https://datasheet.ciiva.com/18184/getdatasheetpartid-90260-18184180.pdf?src-supplier=Verical, ComponentLink4URL=https://datasheet.ciiva.com/18184/getdatasheetpartid-90260-18184180.pdf?src-supplier=Verical, ComponentLink5Description=https://datasheet.ciiva.com/29200/453569-da-01-en-vs-kondensator-0402-29200121.pdf?src-supplier=Conrad, ComponentLink5URL=https://datasheet.ciiva.com/29200/453569-da-01-en-vs-kondensator-0402-29200121.pdf?src-supplier=Conrad, ComponentLink6Description=https://datasheet.ciiva.com/14116/grmseries-tc-hitype-eng-14116858.pdf?src-supplier=Distrelec, ComponentLink6URL=https://datasheet.ciiva.com/14116/grmseries-tc-hitype-eng-14116858.pdf?src-supplier=Distrelec, Stock 1=5192940
  C232: ComponentLink1Description=https://datasheet.ciiva.com/132/product-132800.pdf?src-supplier=Digi-Key, ComponentLink1URL=https://datasheet.ciiva.com/132/product-132800.pdf?src-supplier=Digi-Key, ComponentLink2Description=https://datasheet.ciiva.com/34302/1855908-34302849.pdf?src-supplier=Jameco, ComponentLink2URL=https://datasheet.ciiva.com/34302/1855908-34302849.pdf?src-supplier=Jameco, ComponentLink3Description=https://datasheet.ciiva.com/18184/getdatasheetpartid-90260-18184180.pdf?src-supplier=Verical, ComponentLink3URL=https://datasheet.ciiva.com/18184/getdatasheetpartid-90260-18184180.pdf?src-supplier=Verical, ComponentLink4Description=https://datasheet.ciiva.com/11786/0900766b807a1cab-11786727.pdf?src-supplier=RSComponents, ComponentLink4URL=https://datasheet.ciiva.com/11786/0900766b807a1cab-11786727.pdf?src-supplier=RSComponents, ComponentLink5Description=https://datasheet.ciiva.com/132/grm1555c1h102ja01-01-132799.pdf?src-supplier=Digi-Key, ComponentLink5URL=https://datasheet.ciiva.com/132/grm1555c1h102ja01-01-132799.pdf?src-supplier=Digi-Key, ComponentLink6Description=https://datasheet.ciiva.com/29200/453569-da-01-en-vs-kondensator-0402-29200121.pdf?src-supplier=Conrad, ComponentLink6URL=https://datasheet.ciiva.com/29200/453569-da-01-en-vs-kondensator-0402-29200121.pdf?src-supplier=Conrad, ComponentLink10Description=https://datasheet.ciiva.com/14116/grmseries-tc-hitype-eng-14116919.pdf?src-supplier=Distrelec, ComponentLink10URL=https://datasheet.ciiva.com/14116/grmseries-tc-hitype-eng-14116919.pdf?src-supplier=Distrelec, ComponentLink11Description=https://datasheet.ciiva.com/14116/grmseries-tc-hitype-eng-14116858.pdf?src-supplier=Distrelec, ComponentLink11URL=https://datasheet.ciiva.com/14116/grmseries-tc-hitype-eng-14116858.pdf?src-supplier=Distrelec, Stock 1=5029183
C44 C50 C61: library part Capacitor, Case/Package=0402, Case Code (Metric)=1005, Dielectric=C0G, Manufacturer 1=Samsung, Manufacturer Part Number 1=CL05C220JB5NNNC, Max Operating Temperature=125°C, Min Operating Temperature=-55°C, Package Quantity=1, Supplier Part Number 1=1276-1116-1-ND, Temperature Coefficient=300ppm/°C, Tolerance=5%, Voltage=50V, Capacitance=22pF, Case Code (Imperial)=0402, ComponentLink1Description=https://datasheet.ciiva.com/15195/getdatasheetpartid-358448-15195679.pdf?src-supplier=Verical, ComponentLink1URL=https://datasheet.ciiva.com/15195/getdatasheetpartid-358448-15195679.pdf?src-supplier=Verical, ComponentLink2Description=https://datasheet.ciiva.com/29198/458663-da-01-en-vs-kondensator-0402-29198414.pdf?src-supplier=Conrad, ComponentLink2URL=https://datasheet.ciiva.com/29198/458663-da-01-en-vs-kondensator-0402-29198414.pdf?src-supplier=Conrad, ComponentLink3Description=https://datasheet.ciiva.com/16199/cl05b104kq5nnnc-16199080.pdf?src-supplier=Future+Electronics, ComponentLink3URL=https://datasheet.ciiva.com/16199/cl05b104kq5nnnc-16199080.pdf?src-supplier=Future+Electronics, ComponentLink4Description=https://datasheet.ciiva.com/26309/mlcc-catalogdownload2013-eng-26309032.pdf?src-supplier=Distrelec, ComponentLink4URL=https://datasheet.ciiva.com/26309/mlcc-catalogdownload2013-eng-26309032.pdf?src-supplier=Distrelec, Contact Plating=Tin, Depth=0.5mm, Height=0.5mm, Length=1mm, Material=Ceramic, Mount="Surface Mount", Packaging="Tape and Reel", Pricing 1="1=0.10000, 10=0.03300, 100=0.01480, 500=0.01058, 1000=0.00831, 2500=0.00755, 5000=0.00695 (USD)", Radiation Hardening=No, RoHS=Yes, Stock 1=1523204, Supplier 1=Digi-Key, Thickness=0.022inch, Voltage Rating=50V, Width=0.02inch
C45 C46 C47 C48 C51 C52 C53 C56 C57 C58 C73 C112 C131 C143 C147 C222: library part Capacitor, Case/Package=0603, Case Code (Metric)=1608, Dielectric=X5R, Manufacturer 1=Samsung, Manufacturer Part Number 1=CL10A475KQ8NNNC, Max Operating Temperature=85°C, Min Operating Temperature=-55°C, Package Quantity=1, Supplier Part Number 1=1276-1045-1-ND, Tolerance=20%, Voltage=6.3V, Capacitance=4.7uF, Case Code (Imperial)=0603, ComponentLink1Description=https://datasheet.ciiva.com/15195/getdatasheetpartid-358620-15195714.pdf?src-supplier=Verical, ComponentLink1URL=https://datasheet.ciiva.com/15195/getdatasheetpartid-358620-15195714.pdf?src-supplier=Verical, ComponentLink2Description=https://datasheet.ciiva.com/29198/457675-da-01-en-vs-kondensator-0603-29198672.pdf?src-supplier=Conrad, ComponentLink2URL=https://datasheet.ciiva.com/29198/457675-da-01-en-vs-kondensator-0603-29198672.pdf?src-supplier=Conrad, ComponentLink3Description=https://datasheet.ciiva.com/16437/cl05b104kq5nnnc-16437321.pdf?src-supplier=Future+Electronics, ComponentLink3URL=https://datasheet.ciiva.com/16437/cl05b104kq5nnnc-16437321.pdf?src-supplier=Future+Electronics, Contact Plating=Tin, Depth=0.8mm, Height=0.8mm, Length=1.6mm, Material=Ceramic, Mount="Surface Mount", Packaging="Tape and Reel", Pricing 1="1=0.10000, 10=0.05500, 100=0.02450, 500=0.01750, 1000=0.01375 (USD)", Radiation Hardening=No, RoHS=Yes, Stock 1=3419762, Supplier 1=Digi-Key, Thickness=0.035inch, Voltage Rating=6.3V, Width=0.031inch
C49: library part Capacitor, Case/Package=0402, Case Code (Metric)=1005, Dielectric=X5R, Manufacturer 1=Samsung, Manufacturer Part Number 1=CL05A105MQ5NNNC, Max Operating Temperature=85°C, Min Operating Temperature=-55°C, Package Quantity=1, Supplier Part Number 1=1276-1235-1-ND, Tolerance=20%, Voltage Rating=6.3V, Capacitance=1uF, Case Code (Imperial)=0402, ComponentLink1Description=https://datasheet.ciiva.com/25802/cl05a105mq5nnnc-25802787.pdf?src-supplier=Digi-Key, ComponentLink1URL=https://datasheet.ciiva.com/25802/cl05a105mq5nnnc-25802787.pdf?src-supplier=Digi-Key, ComponentLink2Description=https://datasheet.ciiva.com/26838/getdatasheetpartid-355273-26838165.pdf?src-supplier=Verical, ComponentLink2URL=https://datasheet.ciiva.com/26838/getdatasheetpartid-355273-26838165.pdf?src-supplier=Verical, ComponentLink3Description=https://datasheet.ciiva.com/16387/cl05b104kq5nnnc-16387465.pdf?src-supplier=Future+Electronics, ComponentLink3URL=https://datasheet.ciiva.com/16387/cl05b104kq5nnnc-16387465.pdf?src-supplier=Future+Electronics, Contact Plating=Tin, Depth=0.5mm, Height=0.5mm, Length=1mm, Mount="Surface Mount", Packaging="Tape and Reel", Pricing 1="1=0.10000, 10=0.02600, 100=0.01160, 500=0.00832, 1000=0.00653, 2500=0.00594, 5000=0.00546 (USD)", Radiation Hardening=No, RoHS=Yes, Stock 1=4412453, Supplier 1=Digi-Key, Thickness=0.022inch, Width=0.02inch
C54: library part Capacitor, Case/Package=0603, Case Code (Metric)=1608, Dielectric=X7R, Manufacturer 1=Samsung, Manufacturer Part Number 1=CL10B104KB8NNNC, Max Operating Temperature=125°C, Min Operating Temperature=-55°C, Package Quantity=1, Supplier Part Number 1=1276-1000-1-ND, Tolerance=10%, Voltage=50V, Capacitance=100nF, Case Code (Imperial)=0603, ComponentLink1Description=https://datasheet.ciiva.com/25803/cl10b104kb8nnnc-25803393.pdf?src-supplier=Digi-Key, ComponentLink1URL=https://datasheet.ciiva.com/25803/cl10b104kb8nnnc-25803393.pdf?src-supplier=Digi-Key, ComponentLink2Description=https://datasheet.ciiva.com/26838/getdatasheetpartid-89097-26838411.pdf?src-supplier=Verical, ComponentLink2URL=https://datasheet.ciiva.com/26838/getdatasheetpartid-89097-26838411.pdf?src-supplier=Verical, ComponentLink3Description=https://datasheet.ciiva.com/29198/456651-da-01-en-vs-kondensator-0605-29198839.pdf?src-supplier=Conrad, ComponentLink3URL=https://datasheet.ciiva.com/29198/456651-da-01-en-vs-kondensator-0605-29198839.pdf?src-supplier=Conrad, Contact Plating=Tin, Depth=0.8mm, Height=0.8mm, Lead Free="Lead Free", Length=1.6mm, Material=Ceramic, Mount="Surface Mount", Packaging="Tape and Reel", Pricing 1="1=0.10000, 10=0.02600, 100=0.01170, 500=0.00836, 1000=0.00657 (USD)", Radiation Hardening=No, RoHS=Yes, Stock 1=8464769, Supplier 1=Digi-Key, Thickness=0.035inch, Voltage Rating=50V, Voltage Rating (DC)=50V, Width=0.031inch
C55: library part Capacitor, "Multilayer Ceramic Capacitors MLCC - SMD/SMT 0201 82pF 25volts C0G +/-5%", Case/Package=0402, Case Code (Metric)=1005, Dielectric=C0G, Manufacturer 1=Samsung, Manufacturer Part Number 1=CL05C220JB5NNNC, Max Operating Temperature=125°C, Min Operating Temperature=-55°C, Package Quantity=1, Supplier Part Number 1=1276-1116-1-ND, Temperature Coefficient=300ppm/°C, Tolerance=5%, Voltage=50V, Capacitance=22pF, Case Code (Imperial)=0402, ComponentLink1Description=https://datasheet.ciiva.com/15195/getdatasheetpartid-358448-15195679.pdf?src-supplier=Verical, ComponentLink1URL=https://datasheet.ciiva.com/15195/getdatasheetpartid-358448-15195679.pdf?src-supplier=Verical, ComponentLink2Description=https://datasheet.ciiva.com/29198/458663-da-01-en-vs-kondensator-0402-29198414.pdf?src-supplier=Conrad, ComponentLink2URL=https://datasheet.ciiva.com/29198/458663-da-01-en-vs-kondensator-0402-29198414.pdf?src-supplier=Conrad, ComponentLink3Description=https://datasheet.ciiva.com/16199/cl05b104kq5nnnc-16199080.pdf?src-supplier=Future+Electronics, ComponentLink3URL=https://datasheet.ciiva.com/16199/cl05b104kq5nnnc-16199080.pdf?src-supplier=Future+Electronics, ComponentLink4Description=https://datasheet.ciiva.com/26309/mlcc-catalogdownload2013-eng-26309032.pdf?src-supplier=Distrelec, ComponentLink4URL=https://datasheet.ciiva.com/26309/mlcc-catalogdownload2013-eng-26309032.pdf?src-supplier=Distrelec, Contact Plating=Tin, Depth=0.5mm, Height=0.5mm, Length=1mm, Material=Ceramic, Mount="Surface Mount", Packaging="Tape and Reel", Pricing 1="1=0.10000, 10=0.03300, 100=0.01480, 500=0.01058, 1000=0.00831, 2500=0.00755, 5000=0.00695 (USD)", Radiation Hardening=No, RoHS=Yes, Stock 1=1523204, Supplier 1=Digi-Key, Thickness=0.022inch, Voltage Rating=50V, Width=0.02inch
C59 C60 C69 C70: library part Capacitor, Case/Package=0402, Case Code (Metric)=1005, Manufacturer 1=Murata, Manufacturer Part Number 1=GRM155R61A475MEAAD, Max Operating Temperature=85°C, Min Operating Temperature=-55°C, Supplier Part Number 1=490-14306-1-ND, Tolerance=20%, Voltage Rating=10V, Capacitance=4.7uF, Case Code (Imperial)=0402, ComponentLink1Description=http://www.farnell.com/datasheets/2189109.pdf?src-supplier=Farnell, ComponentLink1URL=http://www.farnell.com/datasheets/2189109.pdf?src-supplier=Farnell, ComponentLink2Description=https://search.murata.co.jp/Ceramy/image/img/A01X/G101/ENG/GRM155R61A475MEAA-01.pdf?src-supplier=Digi-Key, ComponentLink2URL=https://search.murata.co.jp/Ceramy/image/img/A01X/G101/ENG/GRM155R61A475MEAA-01.pdf?src-supplier=Digi-Key, ComponentLink3Description=http://datasheet.octopart.com/GRM155R61A475MEAAD-Murata-datasheet-68589269.pdf?src-supplier=Newark, ComponentLink3URL=http://datasheet.octopart.com/GRM155R61A475MEAAD-Murata-datasheet-68589269.pdf?src-supplier=Newark, ComponentLink4Description=http://datasheet.octopart.com/GRM155R61A475MEAAD-Murata-datasheet-8819587.pdf, ComponentLink4URL=http://datasheet.octopart.com/GRM155R61A475MEAAD-Murata-datasheet-8819587.pdf, ComponentLink5Description=http://datasheet.octopart.com/GRM155R61A475MEAAD-Murata-datasheet-10025737.pdf, ComponentLink5URL=http://datasheet.octopart.com/GRM155R61A475MEAAD-Murata-datasheet-10025737.pdf, ComponentLink6Description=http://datasheet.octopart.com/GRM155R61A475MEAAD-Murata-datasheet-11978611.pdf, ComponentLink6URL=http://datasheet.octopart.com/GRM155R61A475MEAAD-Murata-datasheet-11978611.pdf, ComponentLink7Description=http://datasheet.octopart.com/GRM155R61A475MEAAD-Murata-datasheet-12510076.pdf, ComponentLink7URL=http://datasheet.octopart.com/GRM155R61A475MEAAD-Murata-datasheet-12510076.pdf, ComponentLink8Description=http://datasheet.octopart.com/GRM155R61A475MEAAD-Murata-datasheet-12515295.pdf, ComponentLink8URL=http://datasheet.octopart.com/GRM155R61A475MEAAD-Murata-datasheet-12515295.pdf, Mount="Surface Mount", Packaging="Tape and Reel", Pricing 1="1=0.23000, 10=0.15400, 100=0.07780, 500=0.05322, 1000=0.04708, 2500=0.04504, 5000=0.04094 (USD)", Stock 1=1535315, Supplier 1=Digi-Key
C62 C63 C64 C65: library part Capacitor, "Cap Ceramic 4.7uF 10V X5R 10% SMD 0603 85C T/R", Case/Package=0603, Case Code (Metric)=1608, Dielectric=X5R, Manufacturer 1=Samsung, Manufacturer Part Number 1=CL10A475KQ8NNNC, Max Operating Temperature=85°C, Min Operating Temperature=-55°C, Package Quantity=1, Supplier Part Number 1=1276-1045-1-ND, Tolerance=20%, Voltage=6.3V, Capacitance=4.7uF, Case Code (Imperial)=0603, ComponentLink1Description=https://datasheet.ciiva.com/15195/getdatasheetpartid-358620-15195714.pdf?src-supplier=Verical, ComponentLink1URL=https://datasheet.ciiva.com/15195/getdatasheetpartid-358620-15195714.pdf?src-supplier=Verical, ComponentLink2Description=https://datasheet.ciiva.com/29198/457675-da-01-en-vs-kondensator-0603-29198672.pdf?src-supplier=Conrad, ComponentLink2URL=https://datasheet.ciiva.com/29198/457675-da-01-en-vs-kondensator-0603-29198672.pdf?src-supplier=Conrad, ComponentLink3Description=https://datasheet.ciiva.com/16437/cl05b104kq5nnnc-16437321.pdf?src-supplier=Future+Electronics, ComponentLink3URL=https://datasheet.ciiva.com/16437/cl05b104kq5nnnc-16437321.pdf?src-supplier=Future+Electronics, Contact Plating=Tin, Depth=0.8mm, Height=0.8mm, Length=1.6mm, Material=Ceramic, Mount="Surface Mount", Packaging="Tape and Reel", Pricing 1="1=0.10000, 10=0.05500, 100=0.02450, 500=0.01750, 1000=0.01375 (USD)", Radiation Hardening=No, RoHS=Yes, Stock 1=3419762, Supplier 1=Digi-Key, Thickness=0.035inch, Voltage Rating=6.3V, Width=0.031inch